# Altium PCB LLR-05 (Main-Board-PCB).PcbDoc
Units mm, origin at the board's own origin, x right, y up, seen from the top; angles counter-clockwise.
Board outline 94 x 21 mm, 2 copper layers (Top Layer, Bottom Layer); 17 components, 18 nets, 52 pads, 0 vias.
Unrouted connection lines stored in the file: 31.
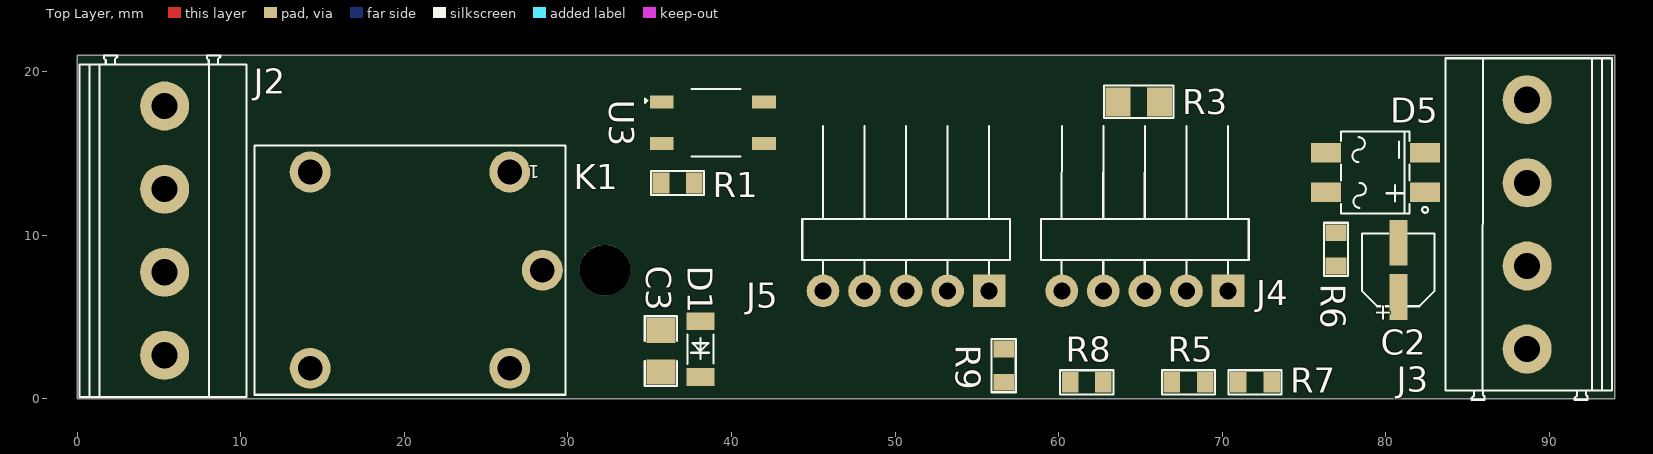
[diagram p0: Top Layer view]
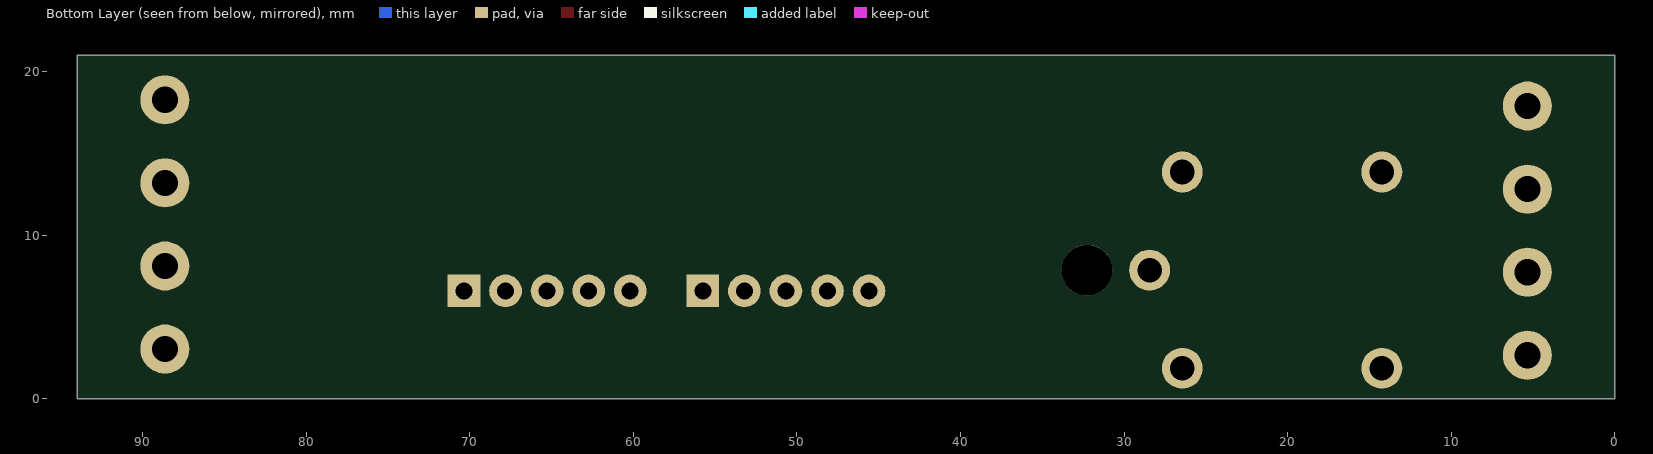
[diagram p1: Bottom Layer view, seen from below]

## Layer stack, top to bottom
Top Solder: solder mask 0.0102, Solder Resist, Dk 3.5
Top Layer: signal copper 0.0356
Dielectric 1: dielectric 0.32, FR-4, Dk 4.8
Bottom Layer: signal copper 0.0356
Bottom Solder: solder mask 0.0102, Solder Resist, Dk 3.5

## Board outline
0,0 0,21 94,21 94,0

## Design rules (kind name [scope] priority, off if disabled: settings)
Clearance [All] p1: gap=0.254 ignorepadtopadclearanceinfootprint=FALSE except(0: Arc-Hole Track-Hole SMDPad-Hole THPad-Hole Via-Hole Fill-Hole Poly-Hole Region-Hole Text-Hole)
PolygonConnect [All] p1: connectstyle=Relief reliefconductorwidth=0.254 reliefentries=4 polygonreliefangle="90 Angle" airgapwidth=0.254
RoutingVias [All] p1: holewidth=0.711 width=1.27 viastyle="Through Hole" minholewidth=0.711 minwidth=1.27 maxholewidth=0.711 maxwidth=1.27
SolderMaskExpansion [All] p1: expansion=0.102 istentingtop=FALSE
Width [All] p1: maxlimit=0.254 minlimit=0.254 preferedwidth=0.254
30 further rules are at their usual default settings.

## Components (designator, comment, footprint, x,y, rotation, side; value= is the part's Value field where it differs from the comment)
C2 "4.7uF" VT1H4R7M0405 80.772,7.883 r90 top
C3 "0.1uF" Cap-1206 35.687,2.921 r270 top
D1 "LL4148" LL-34 38.1,3.048 r90 top
D5 "MB10S" MBS10S 79.375,13.843 r180 top
J2 "DB128V-5.08-4P-GN-S" DB128V-5.08-4P-GN-S 5.334,10.287 r270 top
J3 "DB128V-5.08-4P-GN-S" DB128V-5.08-4P-GN-S 88.646,10.668 r90 top
J4 "PZ254-1-05-W-8.5" "HDR1X5 (R\A)" 65.278,6.604 r180 top
J5 "PZ254-1-05-W-8.5" "HDR1X5 (R\A)" 50.673,6.604 r180 top
K1 "HF3FA/024-ZSTF" HF3FA/024-ZSTF 21.336,7.874 r180 top
R1 "5.1K" RES-0805 36.703,13.208 r0 top
R3 "220R" Res-1206 64.897,18.161 r180 top
R5 "18k" RES-0805 67.945,1.016 r180 top value=18kR
R6 "27K" RES-0805 76.962,9.144 r270 top value=27kR
R7 "15K" RES-0805 72.009,1.016 r180 top
R8 "8.2k" RES-0805 61.722,1.016 r180 top value=8.2kR
R9 "10K" RES-0805 56.642,2.032 r90 top
U3 "TLP185(GB-TPL,SE(T" SOP-4_2.54 38.862,16.891 r0 top

## Footprints (in the part's own frame and the unit in brackets; to place one, negate y for a bottom-side part, rotate by r counter-clockwise, add the part's x,y. Pads: shape width x height; smd on the part's side, far side on the other; paste and mask are expansions set on the pad)
Cap-1206 [mil] "SMD 1206"
  rect 60x70 smd: 1(-50,0) 2(50,0)
  silkscreen extent -84,-39 84,39, body extent -63,-31 63,32, height 39
DB128V-5.08-4P-GN-S [mm]
  round 3 hole 1.6 paste+0 mask+0.05: 1(-7.62,0) 2(-2.54,0) 3(2.54,0) 4(7.62,0)
  silkscreen extent -10.72,-5.2 10.16,5, body extent -10.74,-5.25 10.15,4.95, height 14
"HDR1X5 (R\A)" [mm] "Connector; Header; 5 Position"
  rect 2x2 hole 1.03 paste+0 mask+0.051: 1(-5.08,0)
  round 2 hole 1.03 paste+0 mask+0.051: 2(-2.54,0) 3(0,0) 4(2.54,0) 5(5.08,0)
  silkscreen extent -6.35,-10.08 6.35,-1.03, body extent -6.35,-10.06 6.36,0.34, height 2.5
HF3FA/024-ZSTF [mm]
  round 2.5 hole 1.5 paste+0 mask+0.051: 1(-5.1,-6) 2(7.1,-6) 3(7.1,6) 4(-5.1,6) 5(-7.1,0)
  silkscreen extent -8.5,-7.62 10.5,7.62, body extent -8.5,-7.6 10.5,7.61, height 15.5
LL-34 [mm]
  rect 1.1x1.7 smd paste+0 mask+0.051: 1(-1.7,0) 2(1.7,0)
  silkscreen extent -0.9,-0.8 0.9,0.8, body extent -1.7,-0.74 1.7,0.74, height 1.5
MBS10S [mm]
  rect 1.84x1.2 smd paste+0 mask+0.051: 1(-3.037,1.2) 2(-3.036,-1.2) 3(3.037,-1.2) 4(3.036,1.2)
  silkscreen extent -3.21,-2.5 2.11,2.5, body extent -3.47,-2.35 3.53,2.35, height 2.62
RES-0805 [mil] "SMD 0805"
  rect 40x50 smd: 1(-40,0) 2(40,0)
  silkscreen extent -64,-29 64,29, body extent -39,-25 39,24, height 24
Res-1206 [mil]
  rect 60x70 smd: 1(-50,0) 2(50,0)
  silkscreen extent -84,-39 84,39, body extent -63,-31 63,31, height 24
SOP-4_2.54 [mm]
  rect 1.45x0.8 smd: 1(-3.125,1.27) 2(-3.125,-1.27) 3(3.125,-1.27) 4(3.125,1.27)
  silkscreen extent -4.14,-2.06 1.68,2.06, body extent -3.43,-2 3.43,2, height 2.02
VT1H4R7M0405 [mm]
  rect 2.8x1.1 smd paste+0 mask+0.051: 1(-1.66,0) 2(1.66,0)
  silkscreen extent -2.22,-2.23 2.24,2.23, body extent -2.65,-2.16 2.65,2.14, height 7.02

## Part data
C2: library part VT1H4R7M0405, "4.7uF 50V 14mA@120Hz ±20% SMD,D4xL5.4mm Aluminum Electrolytic Capacitors - SMD ROHS", LCSC Part Number=C213488, Manufacturer=Roqang, Item Type=Capacitor, Manufacturer Part Number=VT1H4R7M0405, RoHS=No, Supplier=LCSC
C3: library part CC1206KKX7R0BB104, "CAP CER 0.1UF 100V X7R 1206", Capacitance=100nF, Case Code (Imperial)=1206, Case Code (Metric)=3216, Dielectric=X7R, Dielectric Material=Ceramic, LCSC Part Number=C107181, Manufacturer=Yageo, Max Operating Temperature=125°C, Min Operating Temperature=-55°C, Package Quantity=1, Tolerance=10%, Voltage=63V, Voltage Rating=100V, Case/Package=1206, Category="Ceramic Capacitors", ComponentLink1Description=https://datasheet.ciiva.com/7978/1447671-7978227.pdf?src-supplier=Element14, ComponentLink1URL=https://datasheet.ciiva.com/7978/1447671-7978227.pdf?src-supplier=Element14, ComponentLink2Description=https://datasheet.ciiva.com/46391/1919308-46391993.pdf?src-supplier=Element14, ComponentLink2URL=https://datasheet.ciiva.com/46391/1919308-46391993.pdf?src-supplier=Element14, ComponentLink3Description=https://datasheet.ciiva.com/180/mlccorderingcode-180145.pdf?src-supplier=Digi-Key, ComponentLink3URL=https://datasheet.ciiva.com/180/mlccorderingcode-180145.pdf?src-supplier=Digi-Key, ComponentLink4Description=https://datasheet.ciiva.com/180/mlccorderingcode-180144.pdf?src-supplier=Digi-Key, ComponentLink4URL=https://datasheet.ciiva.com/180/mlccorderingcode-180144.pdf?src-supplier=Digi-Key, ComponentLink5Description=https://datasheet.ciiva.com/180/mlccorderingcode-180146.pdf?src-supplier=Digi-Key, ComponentLink5URL=https://datasheet.ciiva.com/180/mlccorderingcode-180146.pdf?src-supplier=Digi-Key, ComponentLink6Description=https://datasheet.ciiva.com/5425/upy-gp-np0-16v-to-50v-8-5425573.pdf?src-supplier=Mouser, ComponentLink6URL=https://datasheet.ciiva.com/5425/upy-gp-np0-16v-to-50v-8-5425573.pdf?src-supplier=Mouser, ComponentLink7Description=https://datasheet.ciiva.com/16981/upy-np0x7r-mv-100-to-630v-9-16981180.pdf?src-supplier=Future+Electronics, ComponentLink7URL=https://datasheet.ciiva.com/16981/upy-np0x7r-mv-100-to-630v-9-16981180.pdf?src-supplier=Future+Electronics, ComponentLink8Description=https://datasheet.ciiva.com/26829/getdatasheetpartid-403790-26829655.pdf?src-supplier=Verical, ComponentLink8URL=https://datasheet.ciiva.com/26829/getdatasheetpartid-403790-26829655.pdf?src-supplier=Verical, Depth=1.6mm, Height=1.25mm, Item Type=Capacitor, Lead Free="Lead Free", Length=3.2mm, Manufacturer Part Number=CC1206KKX7R0BB104, Mount="Surface Mount", Number of Pins=2, Packaging="Tape and Reel", Pricing 1="3000=0.01588, 6000=0.01565, 12000=0.01520, 18000=0.01486, 24000=0.01429, 30000=0.01395, 300000=0.01361 (USD)", Radiation Hardening=No, Reach SVHC Compliant=Yes, Resistor Type=Ceramic, RoHS=Yes, RoHS Compliant=Yes, Series=CC, Stock 1=24000, Supplier 1=Avnet, Supplier Part Number 1=CC1206KKX7R0BB104, Termination=SMD/SMT, Thickness=0.057inch, Voltage Rating (DC)=100V, Width=0.063inch
D1: "75V 1V@10mA 4ns 200mA LL-34 Switching Diode ROHS", LCSC Part Number=C435829, Manufacturer=MDD, Package=LL-34, ComponentLink1Description=LCSC, ComponentLink1URL=https://www.lcsc.com/product-detail/Switching-Diode_MDD-Microdiode-Electronics-LL4148_C435829.html, Item Type=Diode, Manufacturer Part Number=LL4148
D5: "35A 1.1V@400mA 1A 1kV MBS Bridge Rectifiers ROHS", JLCPCB Part Number=C2488, Manufacturer=MDD, Package=MBS, ComponentLink1Description=LCSC, ComponentLink1URL=https://www.lcsc.com/product-detail/Bridge-Rectifiers_MCC_MB6S-TP_MB6S-TP_C85619.html?gclid=CjwKCAjwjOunBhB4EiwA94JWsPhP5VxdRhkKtNAXxaeRo8Kbw1z5VNRY74bvbkYd4a4LtLXYHGrsEhoCPX4QAvD_BwE, Item Type="Bridge Rectifier", Manufacturer Part Number=MB10S
J2 J3: "1x4P 20A -40℃~+105℃ 300V Green 12~30 Straight 5.08mm 2.5 1 4 Plugin,P=5.08mm Screw terminal ROHS", LCSC Part Number=C2915641, Manufacturer=DORABO, Package=Plugin,P=5.08mm, ComponentLink1Description=LCSC, ComponentLink1URL=https://www.lcsc.com/product-detail/Screw-terminal_DORABO-DB128V-5-08-4P-GN-S_C2915641.html, Item Type="Screw terminal", Manufacturer Part Number=DB128V-5.08-4P-GN-S
J4 J5: "3A Right-Angle Square Pins 2.5mm 260℃@10S 5P 6mm -40℃~+105℃ 2.54mm Plugin Black 1x5P Push-Pull,P=2.54mm Pin Headers ROHS", LCSC Part Number=C2894947, Manufacturer=HCTL, Package=Push-Pull,P=2.54mm, ComponentLink1Description=LCSC, ComponentLink1URL=https://www.lcsc.com/product-detail/Pin-Headers_HCTL-PZ254-1-05-W-8-5_C2894947.html, Item Type="Pin Headers", Manufacturer Part Number=PZ254-1-05-W-8.5
K1: "24V SPDT (1 Form C) Plugin,15.2x19mm Power Relays ROHS", LCSC Part Number=C194242, Manufacturer="HF(Xiamen Hongfa Electroacoustic)", Package=Plugin,15.2x19mm, ComponentLink1Description=LCSC, ComponentLink1URL=https://www.lcsc.com/product-detail/Power-Relays_HF-Xiamen-Hongfa-Electroacoustic-HF3FA-024-ZSTF_C194242.html, Item Type="Power Relay", Manufacturer Part Number=HF3FA/024-ZSTF
R1: library part 0805W8F5101T5E, "125mW Thick Film Resistors 150V ±100ppm/℃ ±1% 5.1kΩ 0805 Chip Resistor - Surface Mount ROHS", LCSC Part Number=C27834, Manufacturer=UNI-ROYAL, Package=0805, ComponentLink1Description=LCSC, ComponentLink1URL=https://www.lcsc.com/product-detail/Chip-Resistor-Surface-Mount_UNI-ROYAL-Uniroyal-Elec-0805W8F5101T5E_C27834.html, Item Type=Resistor, Manufacturer Part Number=0805W8F5101T5E
R3: library part 1206W4F2200T5E, "250mW Thick Film Resistors 200V ±100ppm/℃ ±1% 220Ω 1206 Chip Resistor - Surface Mount ROHS", LCSC Part Number=C17957, Manufacturer=Uniroyal, Category=LDO, Item Type=Resistor, Manufacturer Part Number=1206W4F2200T5E, RoHS=No, Supplier=LCSC
R5: library part 0805W8F1802T5E, "125mW Thick Film Resistors 150V ±100ppm/℃ ±1% 18kΩ 0805 Chip Resistor - Surface Mount ROHS", LCSC Part Number=C17506, Manufacturer="Royal Electronic Factory", Supplier Part Number=303-0805W8F1802T5E, Item Type=Resistor, Manufacturer Part Number=0805W8F1802T5E, Pricing="10000=0.002 (USD)", RoHS=No, Stock=80000, Supplier=Mouser
R6: library part 0805W8F2702T5E, "125mW Thick Film Resistors 150V ±100ppm/℃ ±1% 27kΩ 0805 Chip Resistor - Surface Mount ROHS", LCSC Part Number=C17593, Manufacturer="Royal Electronic Factory", Supplier Part Number=303-0805W8F2702T5E, Item Type=Resistor, Manufacturer Part Number=0805W8F2702T5E, Pricing="10000=0.002 (USD)", RoHS=No, Stock=75000, Supplier=Mouser
R7: library part 0805W8F1502T5E, "125mW Thick Film Resistors 150V ±100ppm/℃ ±1% 15kΩ 0805 Chip Resistor - Surface Mount ROHS", LCSC Part Number=C17475, Manufacturer=Uniroyal, Category=LDO, Item Type=Resistor, Manufacturer Part Number=0805W8F1502T5E, RoHS=Yes, Supplier=LCSC
R8: library part 0805W8F8201T5E, "125mW Thick Film Resistors 150V ±100ppm/℃ ±1% 8.2kΩ 0805 Chip Resistor - Surface Mount ROHS", LCSC Part Number=C17828, Manufacturer="Royal Electronic Factory", Supplier Part Number=303-0805W8F8201T5E, Item Type=Resistor, Manufacturer Part Number=0805W8F8201T5E, Pricing="10000=0.002 (USD)", RoHS=No, Supplier=Mouser
R9: library part RC0805FR-7W10KL, "RES 10K OHM 1% 1/4W 0805", LCSC Part Number=C723404, Manufacturer=Yageo, Supplier Part Number=49AK3472, Category="Chip SMD Resistors", Item Type=Resistor, Manufacturer Part Number=RC0805FR-7W10KL, Pricing="1=0.153, 25=0.038, 50=0.03, 100=0.02 (USD)", RoHS=Yes, Stock=5000, Supplier=Avnet
U3: "80V 3.75kV 50mA 300mV@2.4mA,8mA 1 5V 1.25V DC SOP-4-2.54mm Transistor Output Optocoupler ROHS", LCSC Part Number=C7240, Manufacturer=TOSHIBA, Package=SOP-4-2.54mm, ComponentLink1Description=LCSC, ComponentLink1URL=https://www.lcsc.com/product-detail/Transistor-Output-Optocoupler_TOSHIBA-TLP185-GB-TPL-SE-T_C7240.html, Item Type=Optocoupler, Manufacturer Part Number=TLP185(GB-TPL,SE(T

## Free pads (board coordinates)
  round 3.1 hole 3.1 unplated: 3(32.258,7.874)

## Nets (pads, with @x,y where several pads share a name; then routed paths per layer and width w, separated by ;. In a path a pad name is that pad's centre, name@x,y a point inside that pad or via, vN(x,y) a via of type N, cw(c..) or ccw(c..) an arc to the next point about the centre after c; other vN are vias at no path point)
NetC2_1: C2.1 J3.2 R6.2 R7.1
NetC2_2: C2.2 D5.2 J5.1 R6.1 R9.2
NetC3_1: C3.1 D1.2 J5.3 K1.1 U3.1
NetC3_2: C3.2 D1.1 J5.2 K1.4 R1.2
NetD5_1: D5.1 J3.3 R3.1
NetD5_3: D5.3 J4.5
NetD5_4: D5.4 J4.4
NetJ2_1: J2.1 J5.5
NetJ2_2: J2.2 K1.5
NetJ2_3: J2.3 K1.3
NetJ2_4: J2.4 K1.2
NetJ3_1: J3.1 U3.3
NetJ3_4: J3.4 J4.1
NetJ4_3: J4.3 R5.2 R8.1
NetR1_1: R1.1 U3.2
NetR3_2: R3.2 U3.4
NetR5_1: R5.1 R7.2
NetR8_2: R8.2 R9.1
pads on no net: J4.2 J5.4

## Silkscreen, mask and mechanical layers (free items; w line width, h text height)
Board Outline:
  the board outline again, w0.254

## Dimensions
0,21 to 0,0 on Board Outline

## Text inside footprints (layer, text, board x,y; h text height)
C2: Top Overlay "+" at 80.278,4.699 h1 r90
K1: Top Overlay "1" at 28.27,14.3 h0.8 r180